# Altium PCB DfPlayer_board.PcbDoc
Units mil, origin at the board's own origin, x right, y up, seen from the top; angles counter-clockwise.
Board outline 1968.5 x 1968.5 mil, 2 copper layers (Top Layer, Bottom Layer); 4 components, 6 nets, 27 pads, 0 vias.
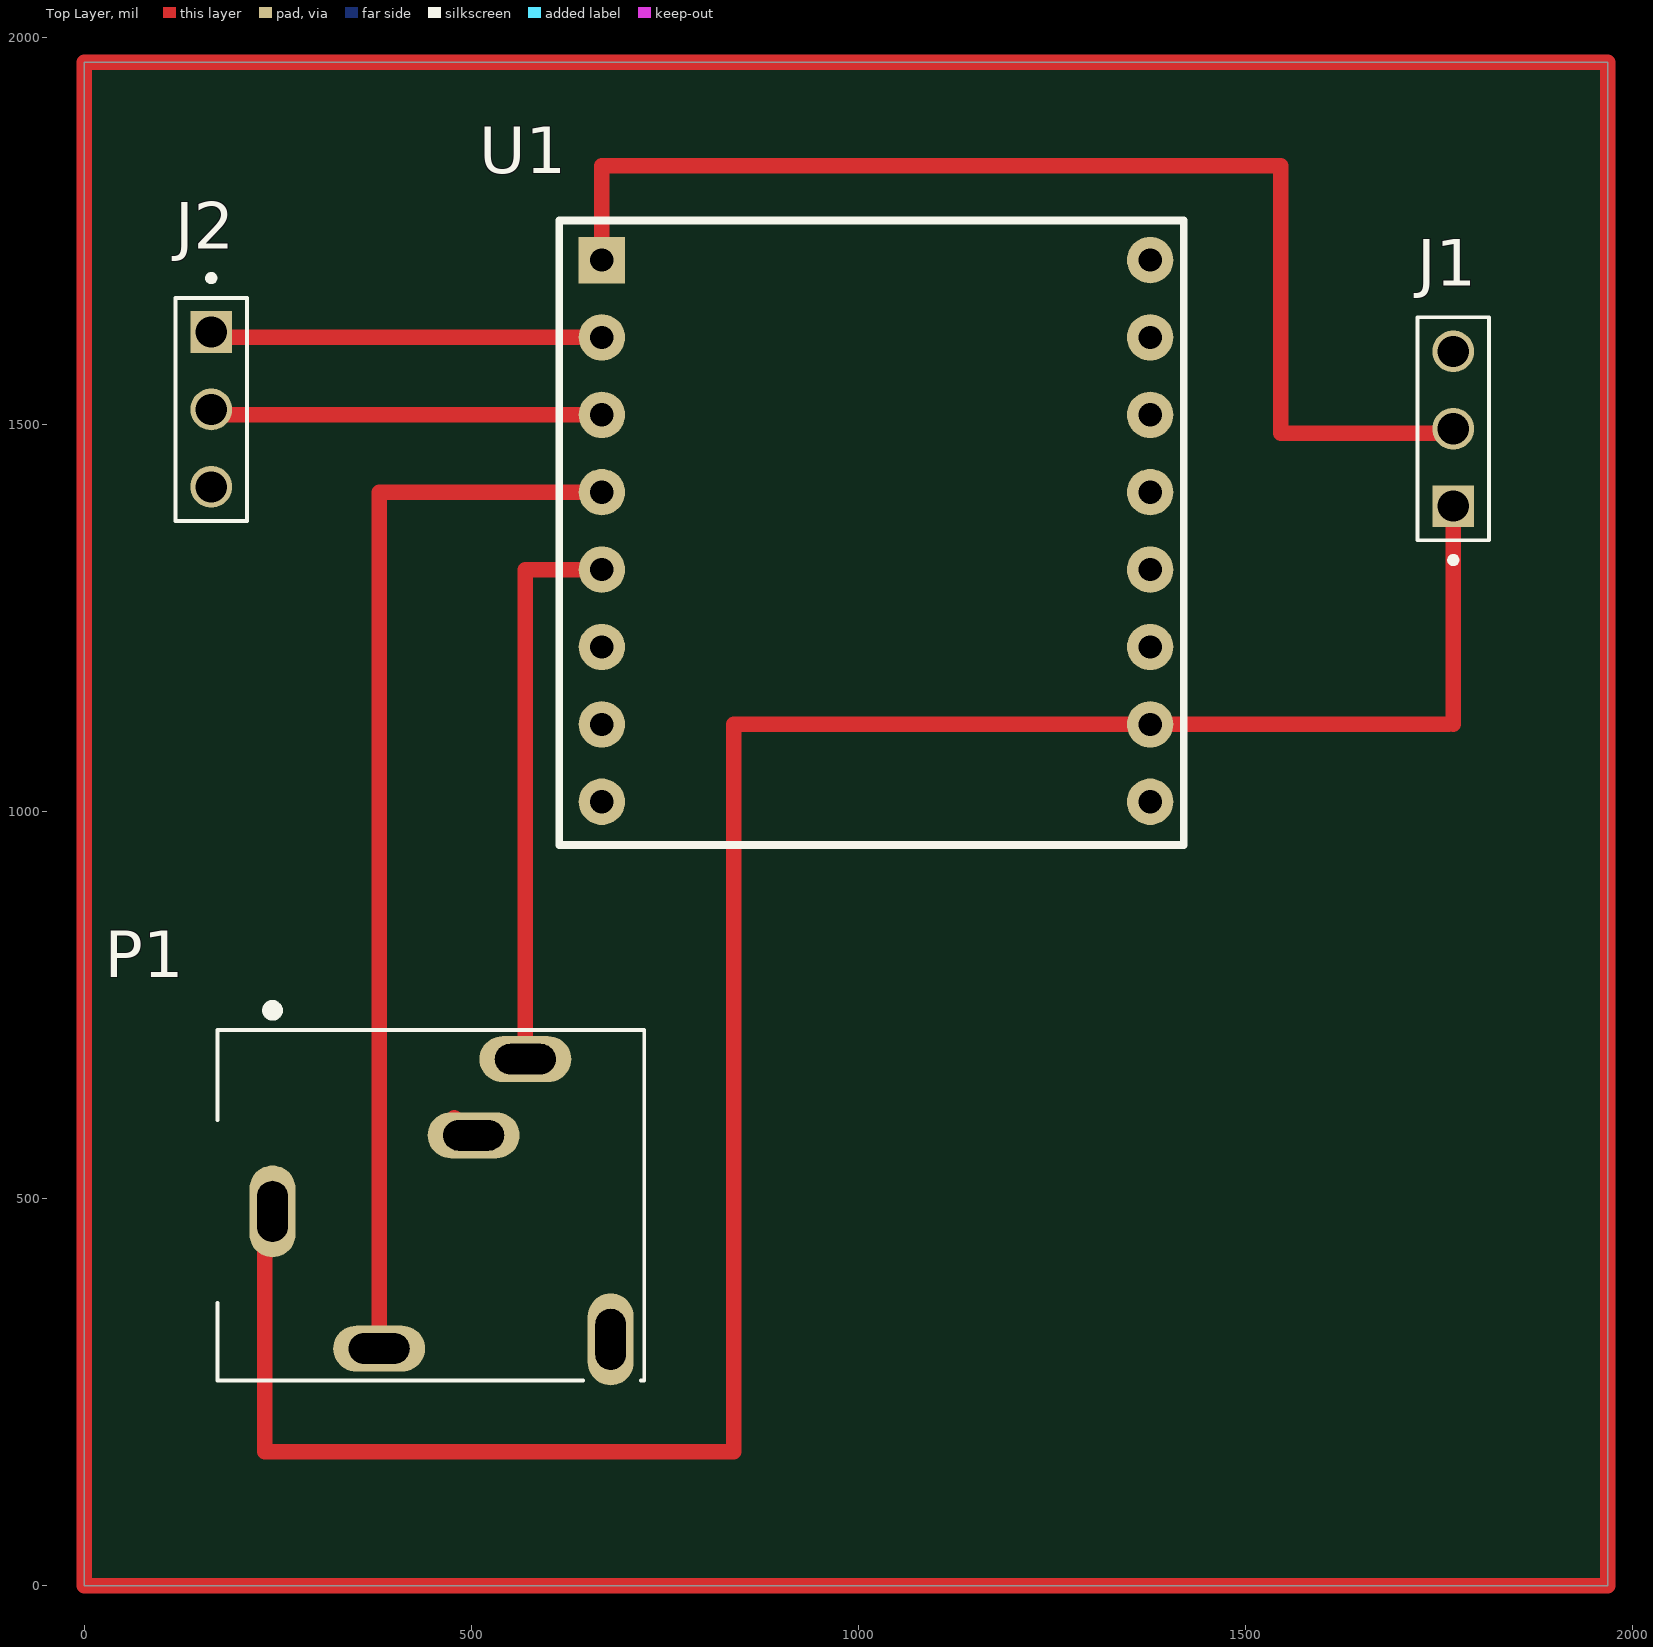
[diagram p0: Top Layer view]
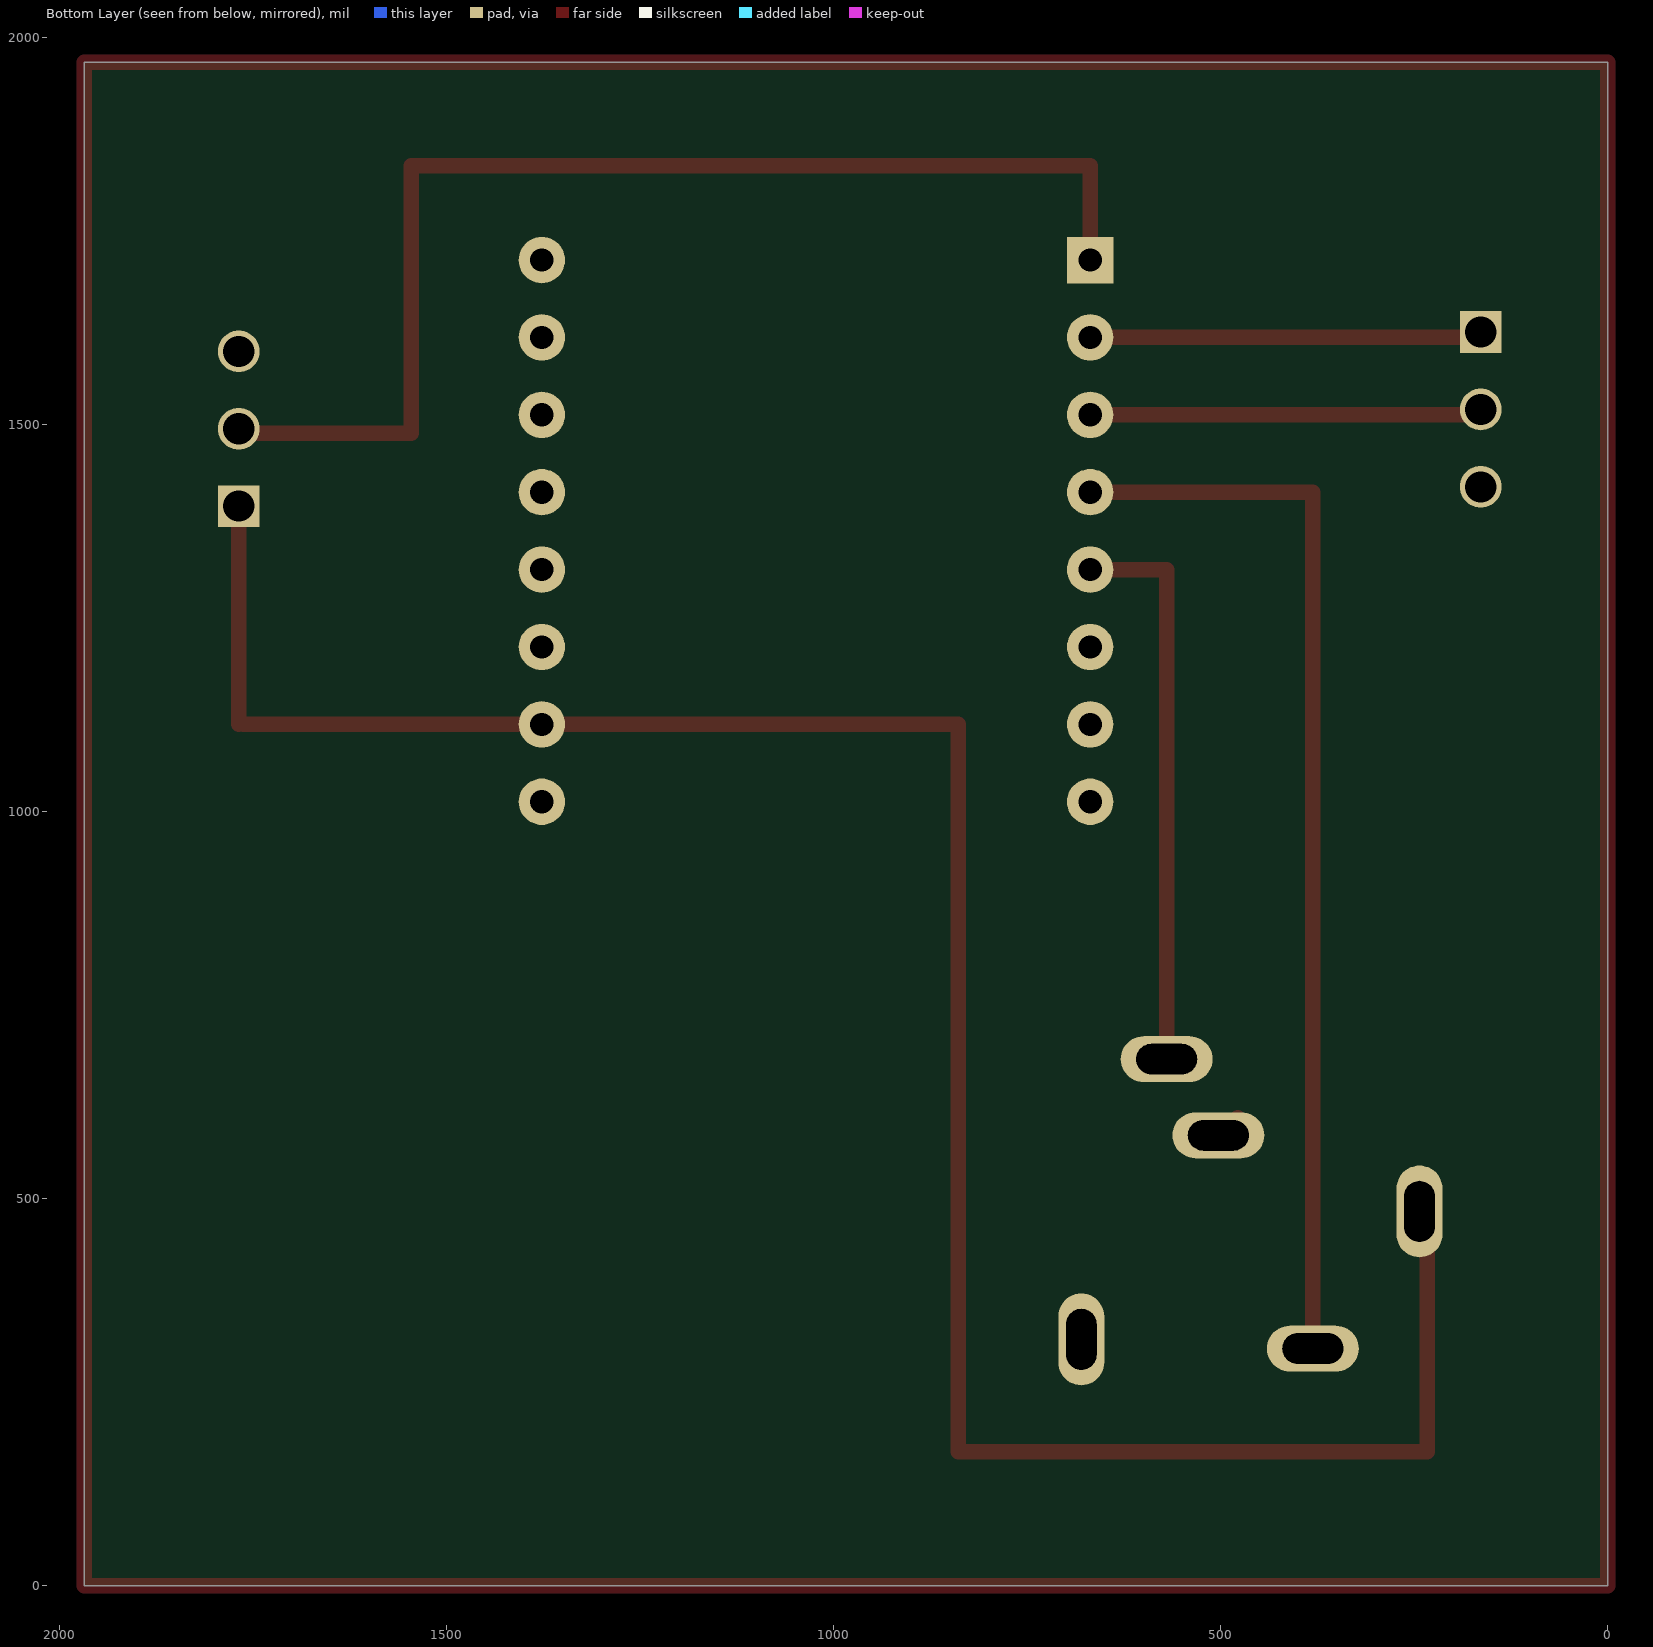
[diagram p1: Bottom Layer view, seen from below]
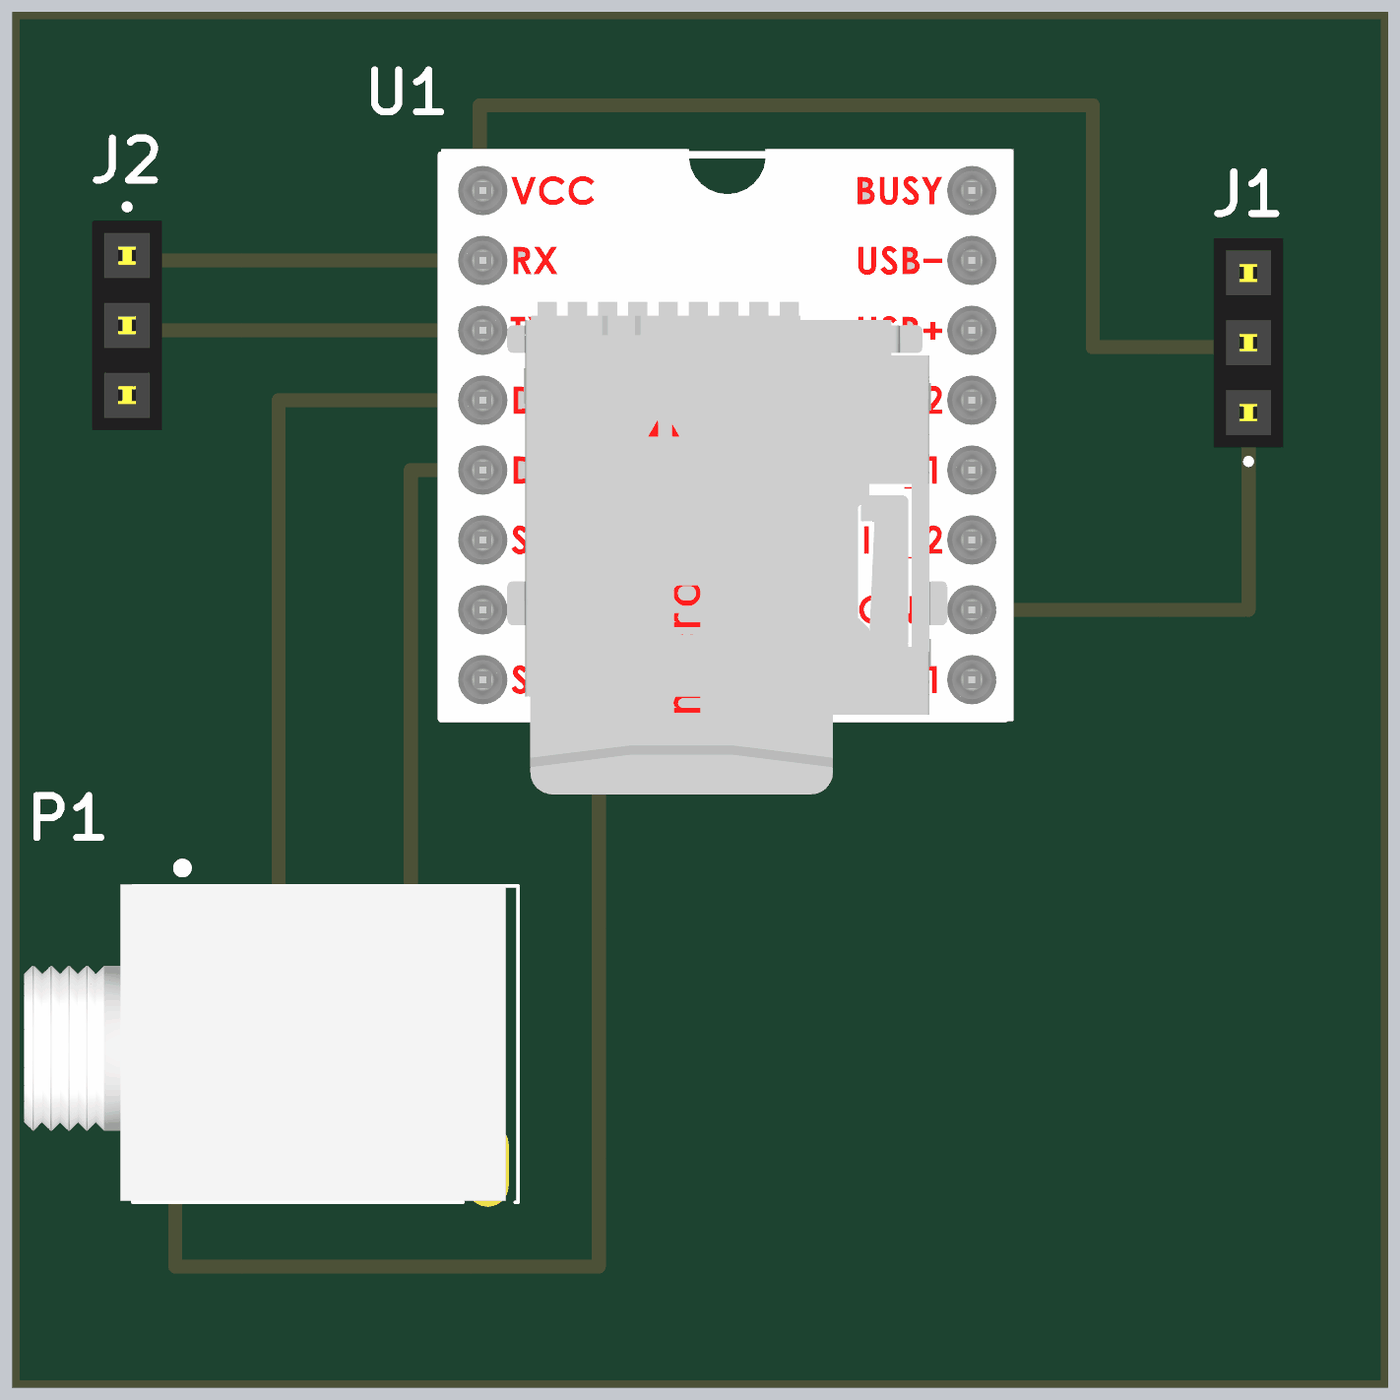
[diagram p2: 3D render of the assembled board from above, using the file's embedded part models]

## Layer stack, top to bottom
Top Solder: solder mask 0.4, Solder Resist, Dk 3.5
Top Layer: signal copper 1.4
Dielectric 1: dielectric 12.6, FR-4, Dk 4.8
Bottom Layer: signal copper 1.4
Bottom Solder: solder mask 0.4, Solder Resist, Dk 3.5

## Board outline
0,0 1968.5,0 1968.5,1968.5 0,1968.5

## Design rules (kind name [scope] priority, off if disabled: settings)
Clearance [All] p1: gap=10 ignorepadtopadclearanceinfootprint=FALSE
PolygonConnect [All] p1: connectstyle=Relief reliefconductorwidth=10 reliefentries=4 polygonreliefangle="90 Angle" airgapwidth=10
RoutingVias [All] p1: holewidth=28 width=50 viastyle="Through Hole" minholewidth=28 minwidth=50 maxholewidth=28 maxwidth=50
SolderMaskExpansion [All] p1: expansion=0 istentingtop=FALSE
Width [All] p1: maxlimit=10 minlimit=10 preferedwidth=10
30 further rules are at their usual default settings.

## Components (designator, comment, footprint, x,y, rotation, side; value= is the part's Value field where it differs from the comment)
J1 "CONN_3X1" TE_644884-3 1769,1395 r90 top
J2 "CONN_3X1" TE_644884-3 164,1620 r270 top
P1 "Jack_Stereo_3.5mm" CUI_SJ1-3515 243.16,483.57 r0 top
U1 "DfPlayer" DFPLAYER_MINI_MP3 1023,1363 r0 top

## Footprints (in the part's own frame and the unit in brackets; to place one, negate y for a bottom-side part, rotate by r counter-clockwise, add the part's x,y. Pads: shape width x height; smd on the part's side, far side on the other; paste and mask are expansions set on the pad)
CUI_SJ1-3515 [mm]
  oval 1.508x3.016 hole 1 slot 2 at 90 deg: 1(0,0) 4(11.1,-4.2)
  oval 3.016x1.508 hole 1 slot 2 at 0 deg: 2(3.5,-4.5) 3(8.3,5) 5(6.6,2.5)
  silkscreen extent -1.8,-5.55 12.2,6.77, body extent -5.75,-5.5 11.75,6, height 5.87
DFPLAYER_MINI_MP3 [mil] "HEADER for DfPlayer mini MP3"
  rect 60x60 hole 30: 1(-354.33,350)
  round 60 hole 30: 2(-354.33,250) 3(-354.33,150) 4(-354.33,50) 5(-354.33,-50) 6(-354.33,-150) 7(-354.33,-250) 8(-354.33,-350) 9(354.33,-350) 10(354.33,-250) 11(354.33,-150) 12(354.33,-50) 13(354.33,50) 14(354.33,150) 14(354.33,250) 16(354.33,350)
  silkscreen extent -409,-406 398,401, body extent -409,-514 409,409, height 315
TE_644884-3 [mm]
  rect 1.37x1.37 / inner round 1.37 / far side rect 1.37x1.37 hole 1.02 mask+0.102: 1(0,0)
  round 1.37 hole 1.02 mask+0.102: 2(2.54,0) 3(5.08,0)
  silkscreen extent -1.87,-1.17 6.2,1.17, body extent -1.27,-1.27 6.35,1.27, height 10.16

## Part data
J1 J2: "Connector 3 vias 1 Row"
P1: "Conector Jack stereo 3.5mm sin microfono"
U1: "Header for DfPlayer mini MP3 2x8 pins"

## Nets (pads, with @x,y where several pads share a name; then routed paths per layer and width w, separated by ;. In a path a pad name is that pad's centre, name@x,y a point inside that pad or via, vN(x,y) a via of type N, cw(c..) or ccw(c..) an arc to the next point about the centre after c; other vN are vias at no path point)
"Audio Left": P1.3 U1.5 | length 731.3
  Top Layer w20: P1.3 569.93,1313 U1.5
"Audio Right": P1.2 U1.4 | length 1394.3
  Top Layer w20: P1.2 380.95,1413 U1.4
GND: J1.1 P1.1 U1.10 | length 3078.7
  Top Layer w10: 1763,1113 1769,1113
  Top Layer w20: P1.1 233,483.57 233,173 839,173 839,1113 U1.10 1763,1113 ; 1769,1113 J1.1
Rx: J2.1 U1.2 | length 511.7
  Top Layer w10: J2.1@164,1613 J2.1
  Top Layer w20: J2.1@164,1613 U1.2
Tx: J2.2 U1.3 | length 511.7
  Top Layer w10: J2.2@164,1513 J2.2
  Top Layer w20: J2.2@164,1513 U1.3
VCC: J1.2 U1.1 | length 1574.3
  Top Layer w10: 668.67,1835 669,1835
  Top Layer w20: U1.1 668.67,1835 ; 669,1835 1546,1835 1546,1489 1769,1489 J1.2
pads on no net: J1.3 J2.3 P1.4 P1.5 U1.6 U1.7 U1.8 U1.9 U1.11 U1.12 U1.13 U1.14 U1.16
copper on no net: | length 7908.1
  Top Layer w20: 478.32,604.81 501.12,582 503,582 ; 0,0 0,1968.5 1968.5,1968.5 1968.5,0 0,0